# Altium PCB Temperature-Controlled DC Fan PCB.PcbDoc
Units mm, origin at the board's own origin, x right, y up, seen from the top; angles counter-clockwise.
Board outline 48.39 x 39.75 mm, 2 copper layers (Top Layer, Bottom Layer), stack 1.67 mm thick; 48 components, 58 nets, 169 pads, 21 vias.
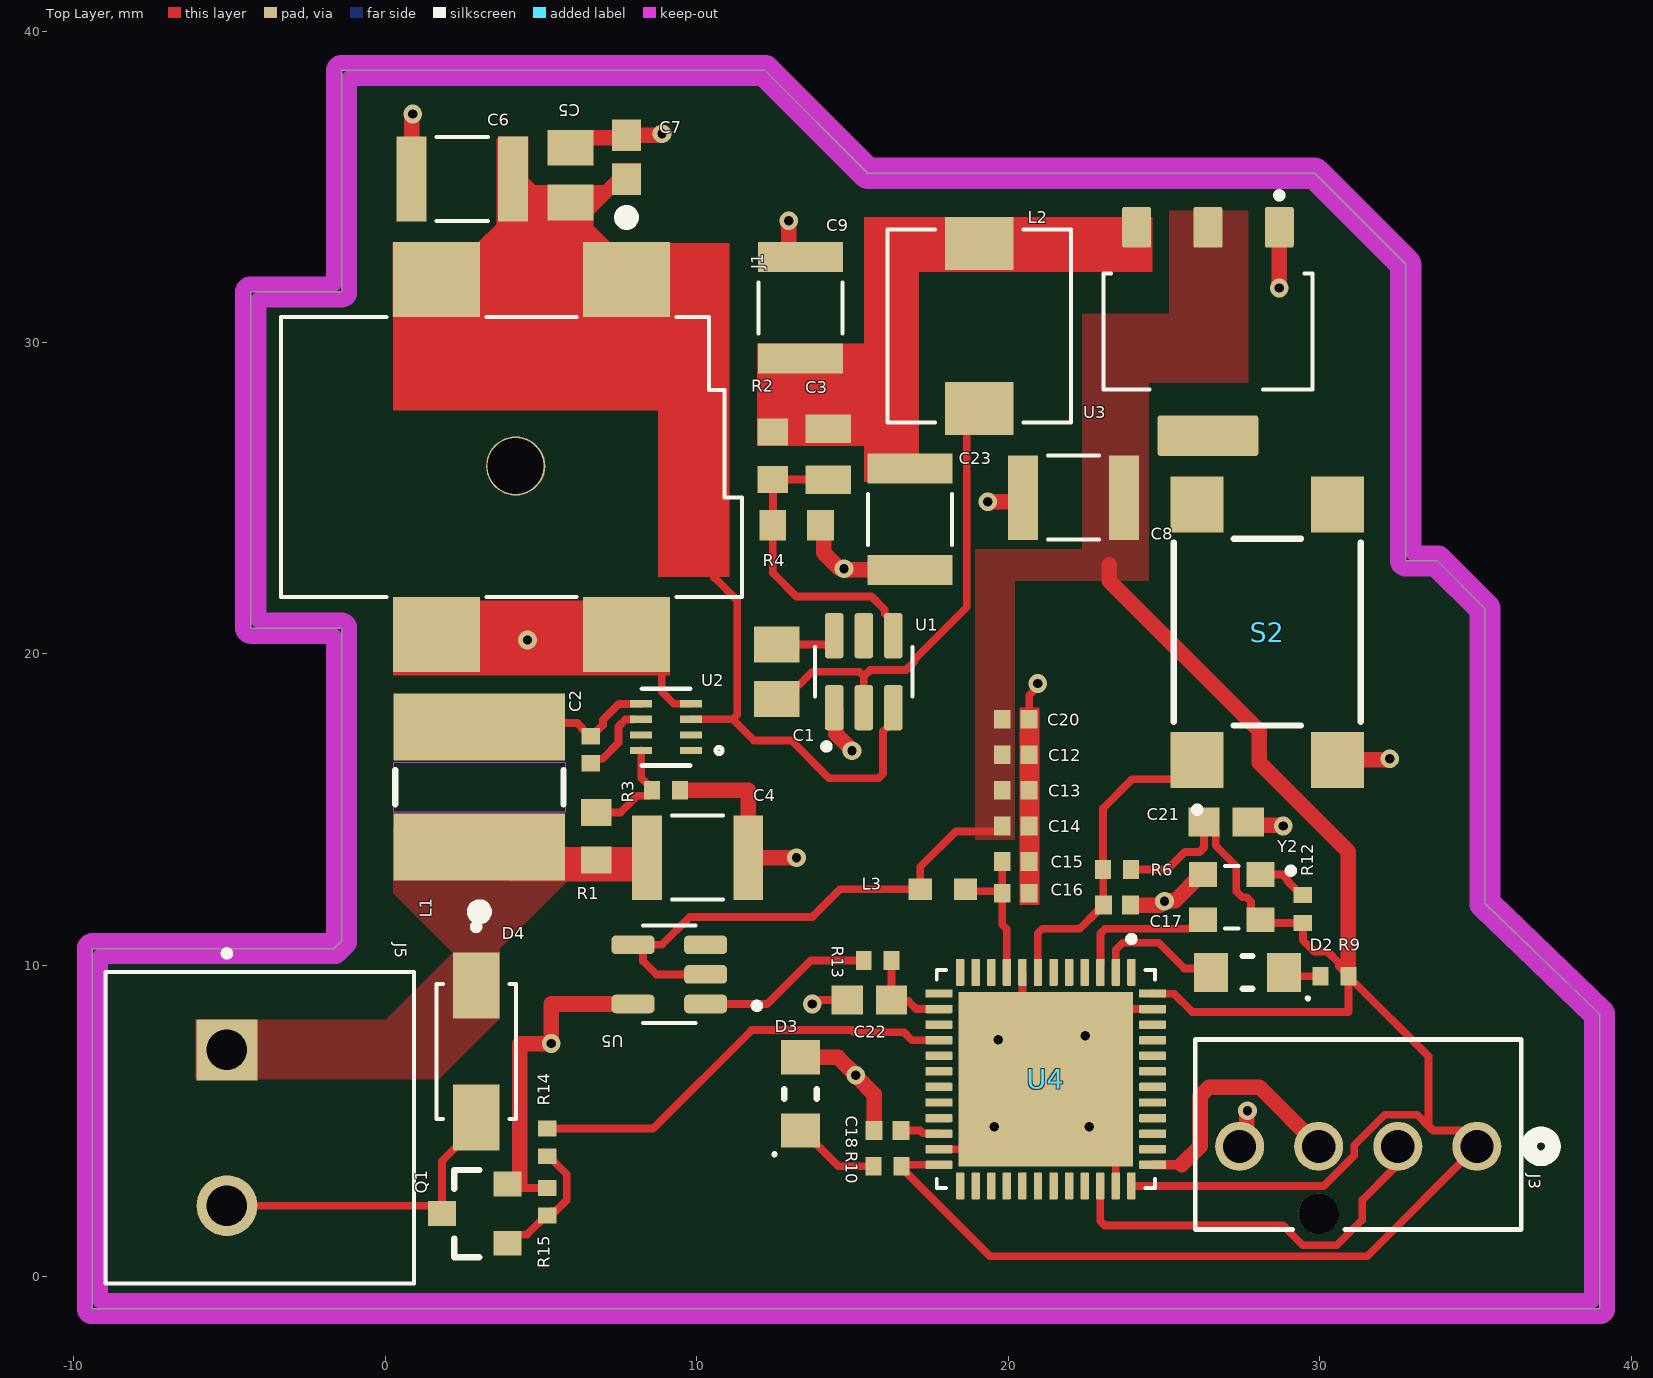
[diagram p0: Top Layer view]
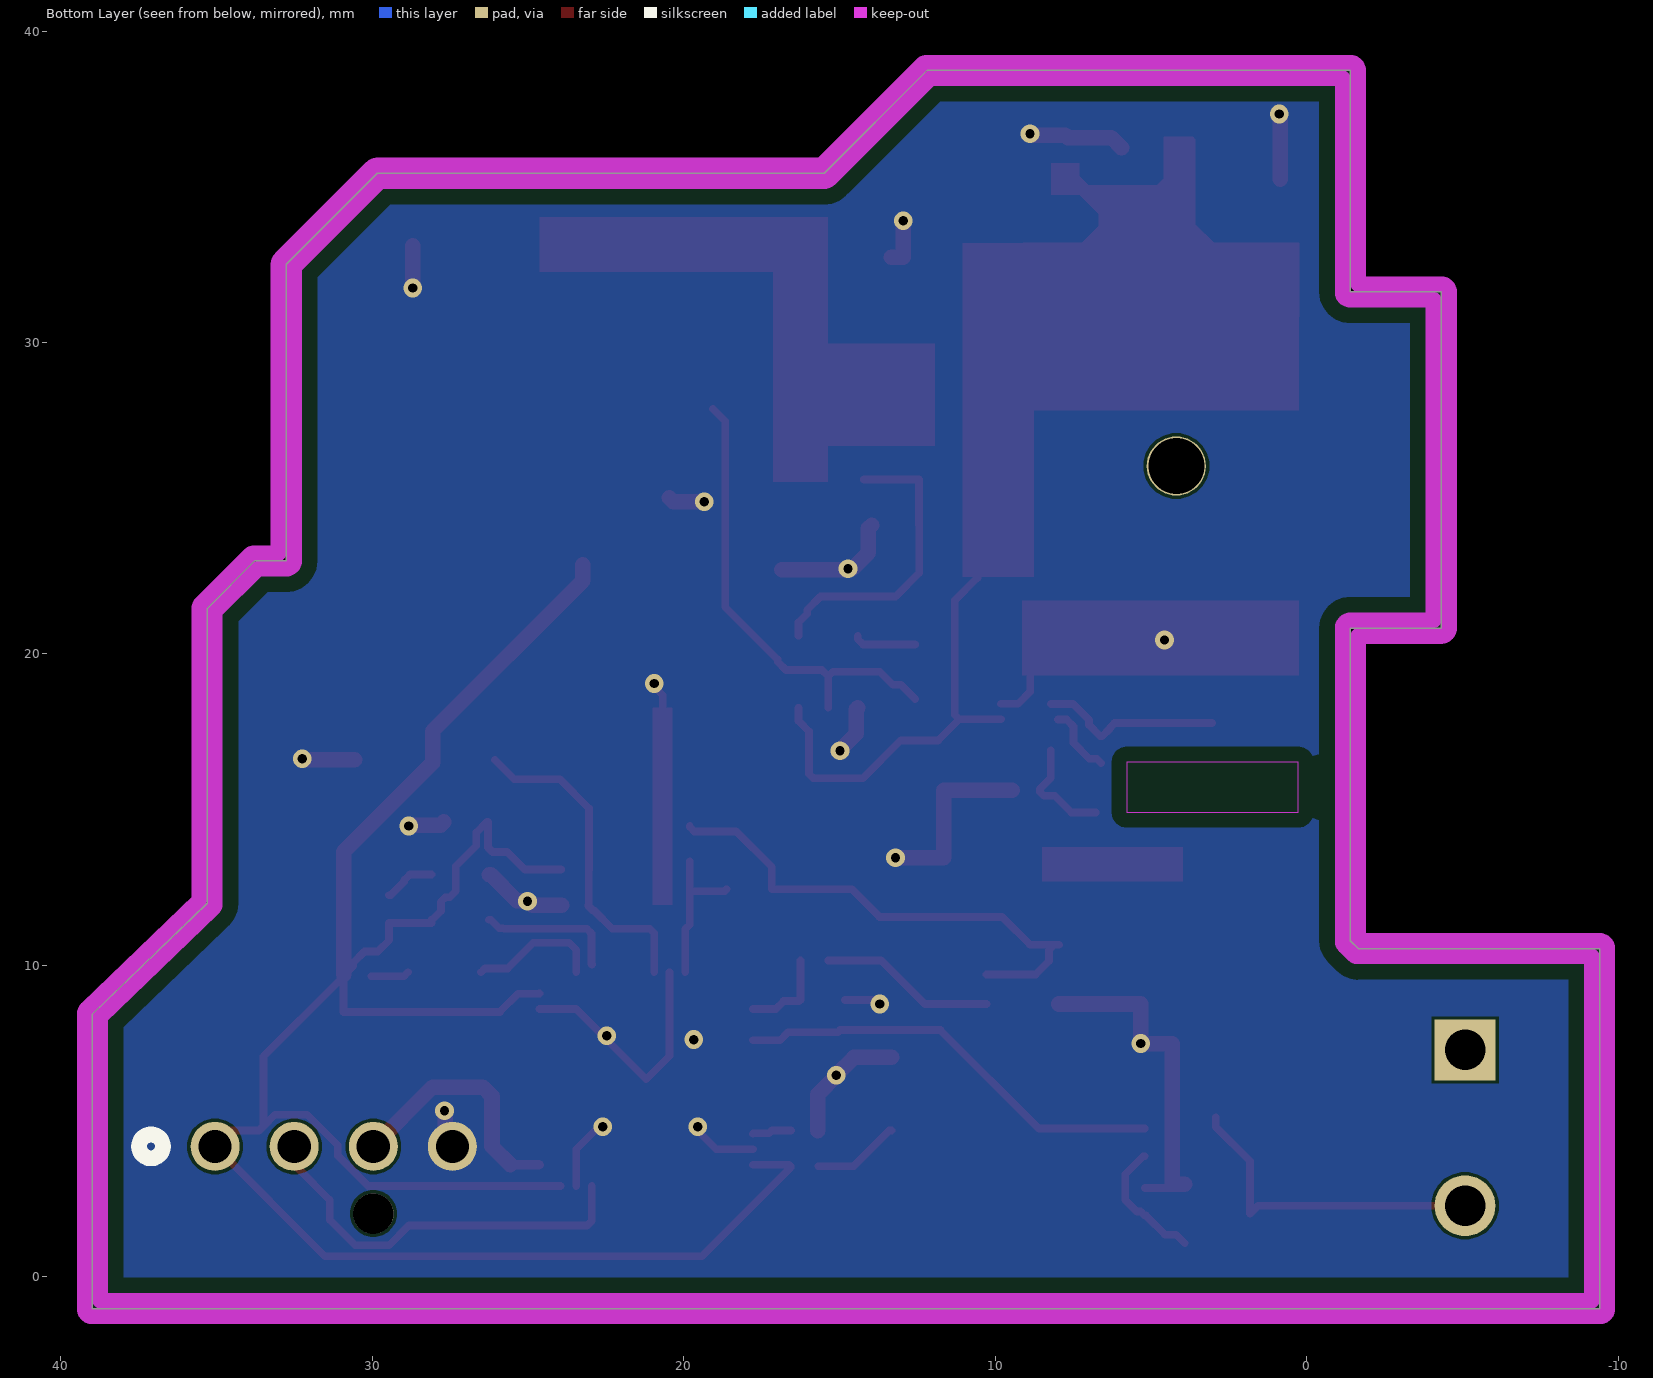
[diagram p1: Bottom Layer view, seen from below]
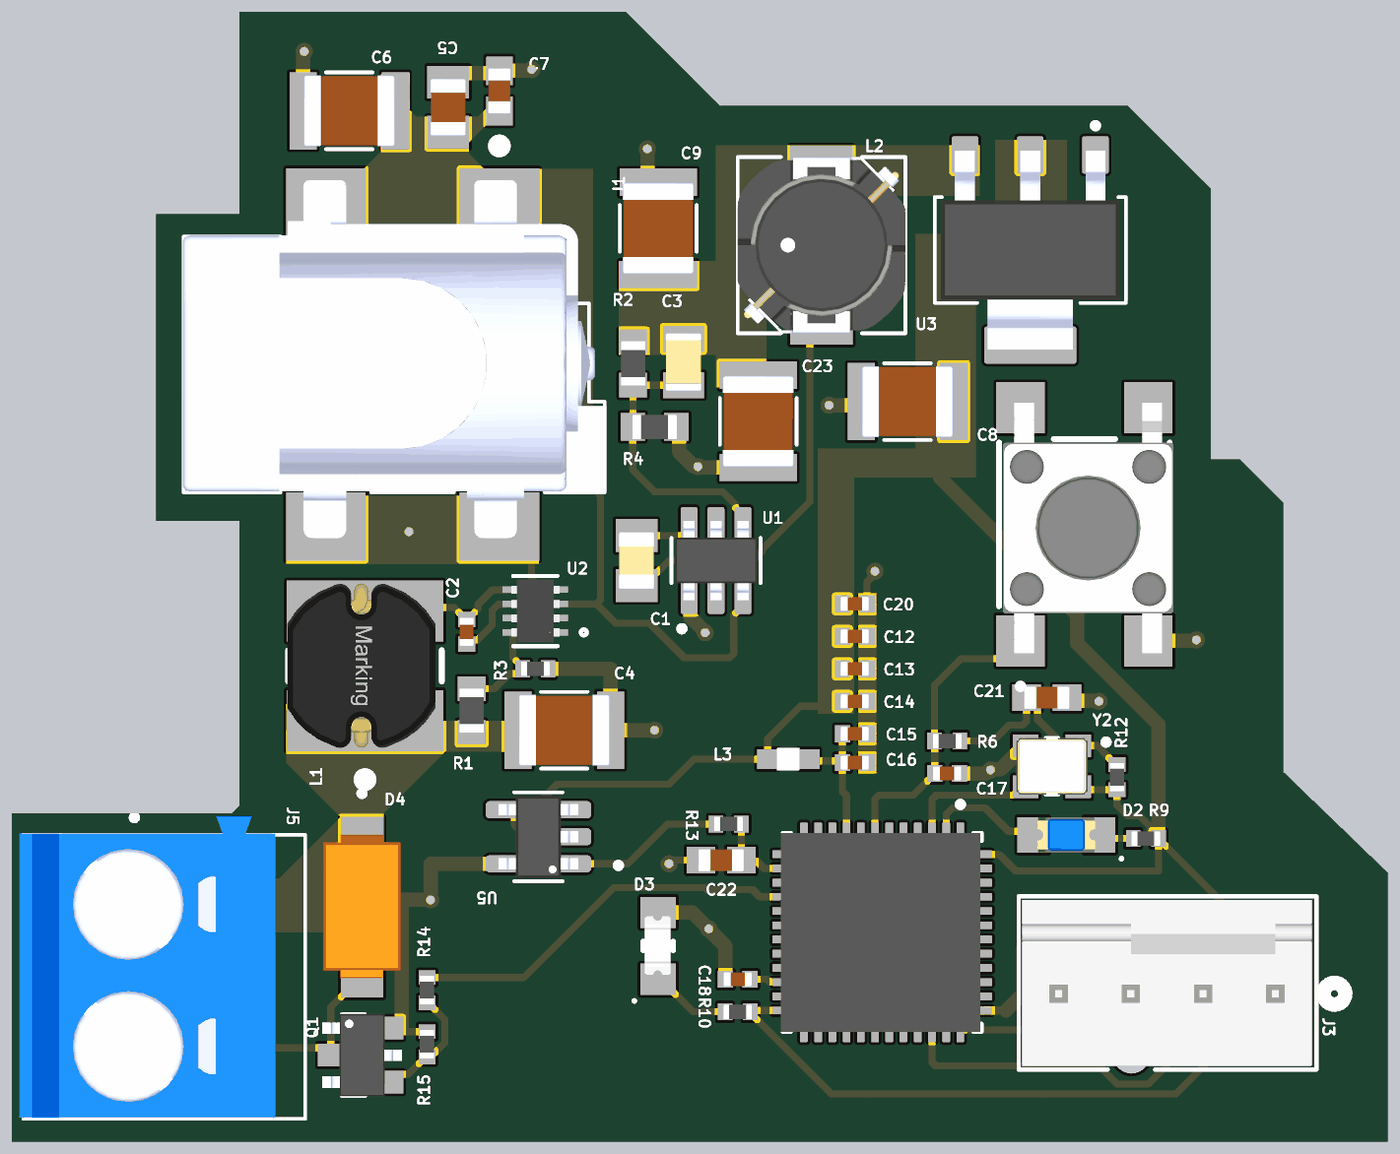
[diagram p2: 3D render of the assembled board from above, using the file's embedded part models]

## Layer stack, top to bottom
Top Solder: solder mask 0.01, Solder Resist, Dk 3.5
Top Layer: signal copper 0.035
Dielectric: dielectric 1.6, FR-4, Dk 4.5
Bottom Layer: signal copper 0.035
Bottom Solder: solder mask 0.01, Solder Resist, Dk 3.5

## Board outline
35.306,21.463 35.306,11.995 38.989,8.439 38.989,-1.016 -9.398,-1.016 -9.398,10.541 -1.651,10.541 -1.397,10.795 -1.397,20.828 -4.318,20.828 -4.318,31.623 -1.397,31.623 -1.397,38.735 12.192,38.735 15.494,35.433 29.845,35.433 32.766,32.512 32.766,22.987 33.782,22.987

## Design rules (kind name [scope] priority, off if disabled: settings)
Clearance Keepout [IsKeepOut] p1: gap=0.5 ignorepadtopadclearanceinfootprint=FALSE
Clearance [All] p2: gap=0.1 ignorepadtopadclearanceinfootprint=FALSE
HoleSize [All] p1: absolutevalues=TRUE maxlimit=6.3 minlimit=0.2 maxpercent=80.000 minpercent=20.000
HoleToHoleClearance [All] p1: gap=0.45 allowstackedmicrovias=TRUE
MinimumSolderMaskSliver [All] p1: minsoldermaskwidth=0
PlaneClearance [All] p1: clearance=0.2
PlaneConnect [All] p1: planeconnectstyle=Direct reliefexpansion=0.508 reliefentries=4 reliefconductorwidth=0.254 reliefairgap=0.254
PolygonConnect [All] p1: connectstyle=Direct reliefconductorwidth=0.254 reliefentries=4 polygonreliefangle="90 Angle" airgapwidth=0.254
RoutingTopology [All] p1: topology=Starburst
RoutingVias [All] p1: holewidth=0.3 width=0.6 viastyle="Through Hole" minholewidth=0.3 minwidth=0.6 maxholewidth=5 maxwidth=10
RoutingVias "Power Vias" [All] p2: holewidth=0.3 width=0.6 viastyle="Through Hole" minholewidth=0.3 minwidth=0.6 maxholewidth=5 maxwidth=10
SilkToSilkClearance [All] p1: silktosilkclearance=0
SilkToSolderMaskClearance [IsPad] p1: minsilkscreentomaskgap=0.1 clearancetoexposedcopper=TRUE
SolderMaskExpansion [All] p1: expansion=0.1 istentingtop=FALSE
SupplyNets "Schematic Supply Nets_4" [InNet('VCC')] p1: voltage=0.000
SupplyNets "Schematic Supply Nets_3" [InNet('+5')] p2: voltage=0.000
SupplyNets "Schematic Supply Nets_2" [InNet('+12')] p3: voltage=0.000
SupplyNets "Schematic Supply Nets_1" [InNet('GND')] p4: voltage=0.000
SupplyNets "Schematic Supply Nets" [InNet('+3.3')] p5: voltage=0.000
Width [All] p1: maxlimit=0.5 minlimit=0.2 preferedwidth=0.25 checkconnectedcopper=TRUE
Width "Power Width" [InNetClass('Power')] p2: maxlimit=2 minlimit=1 preferedwidth=1.2
22 further rules are at their usual default settings.

## Classes and differential pairs
component class U_Sensor: C21 C22 R13 U5
component class U_Actuator: D4 Q1 R14 R15
component class U_Power: C1 C2 C3 C4 C5 C6 C7 C8 C9 C23 J1 L1 L2 R1 R2 R3 R4 U1 U2 U3
component class U_MCU: C12 C13 C14 C15 C16 C17 C18 C20 D2 D3 J3 L3 R6 R9 R10 R12 S2 U4 Y2

## Components (designator, comment, footprint, x,y, rotation, side; value= is the part's Value field where it differs from the comment)
C1 "100 nF" CAPC2012X88N 12.573,19.431 r270 top
C2 "100nF" CAPC1005X55N 6.6,16.925 r270 top
C3 "68 pF" CAPC2013X88N 14.225,26.413 r90 top
C4 "47uF" CAPC3225X270N 10.033,13.462 r0 top
C5 "6.8 µF" CAPC2012X145N 5.95,35.375 r270 top
C6 "10uF" CAPC3225X270N 2.475,35.25 r0 top
C7 "100nF" CAPC1608X90N 7.75,35.95 r90 top
C8 "10uF" CAPC3225X270N 22.098,25.019 r0 top
C9 "10uF" CAPC3225X270N 13.335,31.115 r270 top
C12 "0.1uF" CAPC1005X55N 20.244,16.764 r180 top
C13 "0.1uF" CAPC1005X55N 20.244,15.621 r180 top
C14 "0.1uF" CAPC1005X55N 20.244,14.478 r180 top
C15 "0.1uF" CAPC1005X55N 20.244,13.335 r180 top
C16 "0.1uF" CAPC1005X55N 20.244,12.319 r180 top
C17 "0.1uF" CAPC1005X55N 23.495,11.938 r0 top
C18 "1uF" CAPC1005X55N 16.129,4.699 r180 top
C20 "8pF" CAPC1005X55N 20.244,17.907 r180 top
C21 "0.1uF" CAPC1608X90N 26.998,14.605 r180 top
C22 "100nF" CAPC1608X90N 15.547,8.89 r0 top
C23 "47 µF" CAPC3225X270N 16.85,24.325 r270 top
D2 "Kingbright Blue LED, 60 mcd 120 ° 0805" LED1913X12NBLUE 27.686,9.779 r180 top
D3 "Kingbright Red LED, 100 mcd 120 ° 0805" LED1913X12NRED 13.335,5.874 r90 top
D4 "SS14" DIOM4325X250N 2.921,7.239 r270 top
J1 "PJ-002BH-SMT-TR" CUI_PJ-002BH-SMT-TR 7.75,32.025 r0 top
J3 "470531000" CONN_SD-47053-001_H10P00_MOL 35.052,4.191 r0 top
J5 "OSTTA020161" ONSHORE_OSTTA020161 -5.08,4.786 r270 top
L1 "12uH" WE-PD2_5848 3.025,15.725 r90 top
L2 "15uH" IND_CLF6045T-150M-D 19.075,30.525 r90 top
L3 "150 Ohms100 MHz" WE-CBF_0603_W2.2 17.907,12.446 r180 top
Q1 "AO3400A" SOT23-3 2.921,2.032 r0 top
R1 "140kOhm" RESC1508X50N 6.775,14.15 r270 top
R2 "100k" RESC1508X50N 12.45,26.365 r90 top
R3 "10kOhm" RESC1005X40N 9.017,15.621 r180 top
R4 "13.7k" RESC1508X50N 13.208,24.13 r180 top
R6 "10k Ohm" RESC1005X40N 23.495,13.081 r0 top
R9 "1.5k Ohm" RESC1005X40N 30.48,9.652 r0 top
R10 "5.1k Ohm" RESC1005X40N 16.129,3.556 r0 top
R12 "10k Ohm" RESC1005X40N 29.464,11.811 r270 top
R13 "1k" RESC1005X40N 15.812,10.16 r0 top
R14 "150" RESC1005X40N 5.207,4.318 r270 top
R15 "10k" RESC1005X40N 5.207,2.413 r90 top
S2 "SWT0310-043025GSA_REVA" SW_SWT0310-043025GSA_REVA 28.321,20.701 r90 top
U1 "TPS54202DDCR" SOT95P280X110-6N 15.367,19.431 r90 top
U2 "TPS563300DRLR" SOT5X3-8_DRL_TEX 9.017,17.653 r180 top
U3 "AMS1117-3.3" SOT229P700X180-4N 26.416,30.353 r180 top
U4 "STM32F411CEU6" QFN50P700X700X60-49N 21.209,6.35 r270 top
U5 "TMP36GRTZ-REEL7" SOT95P280X145-5N 9.122,9.713 r180 top
Y2 "ECS-327ATQMV-CN-TR" OSC_ECS-2520S25-250-FN-TR 27.178,12.192 r180 top

## Footprints (in the part's own frame and the unit in brackets; to place one, negate y for a bottom-side part, rotate by r counter-clockwise, add the part's x,y. Pads: shape width x height; smd on the part's side, far side on the other; paste and mask are expansions set on the pad)
CAPC1005X55N [mm]
  rect 0.54x0.6 smd: 1(-0.432,0) 2(0.432,0)
  body extent -0.5,-0.25 0.5,0.25, height 0.55
CAPC1608X90N [mm]
  rect 1.01x0.93 smd: 1(-0.709,0) 2(0.709,0)
  body extent -0.8,-0.4 0.8,0.4, height 0.9
CAPC2012X88N [mm]
  rect 1.16x1.47 smd paste+0 mask+0.102: 1(-0.875,0) 2(0.875,0)
  body extent -1,-0.63 1,0.63, height 0.88
CAPC2012X145N [mm]
  rect 1.15x1.47 smd: 1(-0.88,0) 2(0.88,0)
  body extent -1,-0.63 1,0.63, height 1.45
CAPC2013X88N [mil]
  rect 36x57 smd: 1(-32,0) 2(32,0)
  body extent -40,-25 40,25, height 55
CAPC3225X270N [mm]
  rect 0.96x2.72 smd: 1(-1.625,0) 2(1.625,0)
  silkscreen extent -0.82,-1.35 0.82,1.35, body extent -1.6,-1.25 1.6,1.25, height 2.7
CONN_SD-47053-001_H10P00_MOL [mil]
  round 62 hole 42: 1(0,0) 2(-100,0) 3(-200,0) 4(-300,0)
  round 51 hole 51 unplated: ""(-200,-85)
  silkscreen extent -356,-105 96,135, body extent -352,-100 50,130, height 391
CUI_PJ-002BH-SMT-TR [mm]
  rect 2.8x2.4 smd: 1A(0,0) 1B(-6.1,0) 2(-6.1,-11.4) 3(0,-11.4)
  round 1.9 hole 1.8 unplated: ""(-3.559,-5.99)
  silkscreen extent -11.1,-10.2 3.7,2.19, body extent -11.13,-11.81 3.77,0.79, height 11.05
DIOM4325X250N [mm]
  rect 2.12x1.5 smd paste+0 mask+0.102: A(2.115,0) C(-2.115,0)
  silkscreen extent -4.1,-1.28 2.16,1.28, body extent -2.55,-1.35 2.5,1.35, height 2.19
IND_CLF6045T-150M-D [mm]
  rect 1.7x2.2 smd: 1(-2.65,0) 2(2.65,0)
  silkscreen extent -3.1,-2.95 3.1,2.95, body extent -3.1,-2.95 3.1,2.95, height 4.8
LED1913X12NBLUE [mm] "LED 2-Leads, Body 1.90x1.32mm, IPC Medium Density"
  rect 1.1x1.25 smd: 1(-1.175,0) 2(1.175,0)
  silkscreen extent -1.99,-0.53 0.15,0.89, body extent -1,-0.62 1.02,0.62, height 1.1
LED1913X12NRED [mm] "LED 2-Leads, Body 1.90x1.32mm, IPC Medium Density"
  rect 1.1x1.25 smd: 1(-1.175,0) 2(1.175,0)
  silkscreen extent -1.99,-0.53 0.15,0.89, body extent -1.02,-0.43 1.04,0.47, height 0.85
ONSHORE_OSTTA020161 [mm]
  rect 1.95x1.95 / inner round 1.95 / far side rect 1.95x1.95 hole 1.3: 1(-2.5,0)
  round 1.95 hole 1.3: 2(2.5,0)
  silkscreen extent -5.7,-3.9 5,6, body extent -5.65,-4.05 4.95,4.95, height 12.6
OSC_ECS-2520S25-250-FN-TR [mm]
  rect 0.9x0.8 smd: 1(-0.925,-0.725) 2(0.925,-0.725) 3(0.925,0.725) 4(-0.925,0.725)
  silkscreen extent -2,-1 0.22,1, body extent -1.25,-1 1.25,1, height 0.9
QFN50P700X700X60-49N [mm]
  rrect25% 0.87x0.27 smd: 1(-3.43,2.75) 2(-3.43,2.25) 3(-3.43,1.75) 4(-3.43,1.25) 5(-3.43,0.75) 6(-3.43,0.25) 7(-3.43,-0.25) 8(-3.43,-0.75) 9(-3.43,-1.25) 10(-3.43,-1.75) 11(-3.43,-2.25) 12(-3.43,-2.75) 25(3.43,-2.75) 26(3.43,-2.25) 27(3.43,-1.75) 28(3.43,-1.25) 29(3.43,-0.75) 30(3.43,-0.25) 31(3.43,0.25) 32(3.43,0.75) 33(3.43,1.25) 34(3.43,1.75) 35(3.43,2.25) 36(3.43,2.75)
  rrect25% 0.27x0.87 smd: 13(-2.75,-3.43) 14(-2.25,-3.43) 15(-1.75,-3.43) 16(-1.25,-3.43) 17(-0.75,-3.43) 18(-0.25,-3.43) 19(0.25,-3.43) 20(0.75,-3.43) 21(1.25,-3.43) 22(1.75,-3.43) 23(2.25,-3.43) 24(2.75,-3.43) 37(2.75,3.43) 38(2.25,3.43) 39(1.75,3.43) 40(1.25,3.43) 41(0.75,3.43) 42(0.25,3.43) 43(-0.25,3.43) 44(-0.75,3.43) 45(-1.25,3.43) 46(-1.75,3.43) 47(-2.25,3.43) 48(-2.75,3.43)
  rect 5.6x5.6 smd paste-4: 49(0,0)
  silkscreen extent -4.6,-3.5 3.5,3.5, body extent -3.5,-3.56 3.5,3.44, height 0.6
RESC1005X40N [mm]
  rect 0.51x0.6 smd paste+0 mask+0.102: 1(-0.445,0) 2(0.445,0)
  body extent -0.5,-0.25 0.5,0.25, height 0.4
RESC1508X50N [mm]
  rect 0.86x0.98 smd paste+0 mask+0.102: 1(-0.765,0) 2(0.765,0)
  body extent -0.77,-0.43 0.77,0.43, height 0.5
SOT5X3-8_DRL_TEX [mm]
  rect 0.706x0.229 smd paste+0 mask+0: 1(-0.798,0.75) 2(-0.798,0.25) 3(-0.798,-0.25) 4(-0.798,-0.75) 5(0.798,-0.75) 6(0.798,-0.25) 7(0.798,0.25) 8(0.798,0.75)
  silkscreen extent -1.8,-1.23 0.77,1.23, body extent -0.85,-1.1 0.85,1.1, height 0.61
SOT23-3 [mm]
  rect 0.9x0.8 smd: 1(1,-0.95) 2(1,0.95) 3(-1.1,0)
  silkscreen extent -0.7,-1.4 0.1,1.4, body extent -1.4,-1.45 1.4,1.45, height 1.25
SOT95P280X110-6N [mm]
  rrect25% 1.45x0.59 smd: 1(-1.155,0.95) 2(-1.155,0) 3(-1.155,-0.95) 4(1.155,-0.95) 5(1.155,0) 6(1.155,0.95)
  silkscreen extent -2.5,-1.56 0.8,1.56, body extent -1.4,-1.45 1.4,1.45, height 1.1
SOT95P280X145-5N [mm]
  rrect50% 1.39x0.6 smd: 1(-1.165,0.95) 2(-1.165,0) 3(-1.165,-0.95) 4(1.165,-0.95) 5(1.165,0.95)
  silkscreen extent -2.91,-1.56 0.85,1.56, body extent -1.4,-1.45 1.4,1.45, height 1.45
SOT229P700X180-4N [mm]
  rrect15% 0.93x1.31 smd: 1(-2.29,-3.345) 2(0,-3.345) 3(2.29,-3.345)
  rrect15% 3.24x1.31 smd: 4(0,3.345)
  silkscreen extent -3.36,-4.47 3.36,1.86, body extent -3.15,-3.5 3.15,3.5, height 1.8
SW_SWT0310-043025GSA_REVA [mm]
  rect 1.8x1.7 smd paste+0 mask+0.102: 1(-4.1,2.25) 2(4.1,2.25) 3(-4.1,-2.25) 4(4.1,-2.25)
  silkscreen extent -5.8,-3 3,3, body extent -4.53,-3.13 4.27,2.87, height 4.3
WE-CBF_0603_W2.2 [mm]
  rect 0.75x0.7 smd: 1(-0.725,0) 2(0.725,0)
  body extent -0.4,-0.4 0.4,0.4, height 0.8
WE-PD2_5848 [mm]
  rect 2.15x5.5 smd paste+0 mask+0.102: 1(-1.925,0) 2(1.925,0)
  Keep-Out Layer region: 0.8,-2.75 -0.8,-2.75 -0.8,2.75 0.8,2.75
  silkscreen extent -4.2,-2.7 0.55,2.7, body extent -2.89,-2.47 2.9,2.73, height 4.5

## Part data
C1: library part C0805C104M5RACTU, "0.1 ÂµF Â±20% 50V Ceramic Capacitor X7R 0805 (2012 Metric)", Package=Package, Check_prices=https://www.snapeda.com/parts/C0805C104M5RAC-TU/Kemet/view-part/?ref=eda, MF=Kemet, MP=C0805C104M5RAC-TU, SnapEDA_Link=https://www.snapeda.com/parts/C0805C104M5RAC-TU/Kemet/view-part/?ref=snap
C2 C12 C13 C14 C15 C16 C17 C18 C20: library part GRM155R71A104KA01D, "GRM155R71A104KA01D Cap C eramic 0.1uF 10VDC X7R 10 % SMD 0402 Paper T/R RoHS", Package="1005-2 Murata", Check_prices=https://www.snapeda.com/parts/GRM155R71A104KA01D/Murata/view-part/?ref=eda, MF=Murata, MP=GRM155R71A104KA01D, SnapEDA_Link=https://www.snapeda.com/parts/GRM155R71A104KA01D/Murata/view-part/?ref=snap
C3: library part C0805C680J5GACTU, "Capacitor;Ceramic;Cap;68.0pF;Tol+5%;SMT;Vol-Rtg 50V;C0G", Package="0805 Kemet", Check_prices=https://www.snapeda.com/parts/C0805C680J5GACTU/KEMET/view-part/?ref=eda, MF=KEMET, MP=C0805C680J5GACTU, SnapEDA_Link=https://www.snapeda.com/parts/C0805C680J5GACTU/KEMET/view-part/?ref=snap
C4 C23: library part GRM32ER61C476KE15L, "SMD Capacitor X5R(EIA) with Capacitance: 47uF Tol. 10%. Rated Voltage: 16Vdc", Package="3225 Murata", Check_prices=https://www.snapeda.com/parts/GRM32ER61C476KE15L/Murata+Electronics+North+America/view-part/?ref=eda, MF="Murata Electronics", MP=GRM32ER61C476KE15L, SnapEDA_Link=https://www.snapeda.com/parts/GRM32ER61C476KE15L/Murata+Electronics+North+America/view-part/?ref=snap
C5: library part C2012X5R1V685K125AC, "6.8Î¼F Â±10% 35V é™¶ç“·ç”µå®¹å™¨ X5R 0805ï¼ˆ2012 å…¬åˆ¶ï¼‰", Package="2012 TDK", Availability="In Stock", Check_prices=https://www.snapeda.com/parts/C2012X5R1V685K125AC/TDK-Lambda+Americas+Inc/view-part/?ref=eda, MF=TDK, MP=C2012X5R1V685K125AC, Price=None, Purchase-URL=https://pricing.snapeda.com/search/part/C2012X5R1V685K125AC/?ref=eda, SnapEDA_Link=https://www.snapeda.com/parts/C2012X5R1V685K125AC/TDK-Lambda+Americas+Inc/view-part/?ref=snap
C6: library part MSASU32MSB5106KPNA01, "10uF 50V 10% Multilayer Ceramic Capacitor X5R 1210 (3225 Metric)", Package="3225-2 TAIYO", Check_prices=https://www.snapeda.com/parts/MSASU32MSB5106KPNA01/Taiyo+Yuden/view-part/?ref=eda, MF="Taiyo Yuden", MP=MSASU32MSB5106KPNA01, SnapEDA_Link=https://www.snapeda.com/parts/MSASU32MSB5106KPNA01/Taiyo+Yuden/view-part/?ref=snap
C7 C21 C22: library part CGA3E2X7R1H104K080AA, "0.1ÂµF Â±10% 50V Ceramic Capacitor X7R 0603 (1608 Metric)", Package="1608 TDK", Check_prices=https://www.snapeda.com/parts/CGA3E2X7R1H104K080AA/TDK-Lambda+Americas+Inc/view-part/?ref=eda, MF=TDK, MP=CGA3E2X7R1H104K080AA, Purchase-URL=https://pricing.snapeda.com/search/part/CGA3E2X7R1H104K080AA/?ref=eda, SnapEDA_Link=https://www.snapeda.com/parts/CGA3E2X7R1H104K080AA/TDK-Lambda+Americas+Inc/view-part/?ref=snap
C8 C9: library part MSASU32MSB5106KPNA01, "Cap = 10 µF / Total Derated Cap = 3.5 µF / VDC = 25 V / ESR = 5.85 mΩ / Package = 0805", Package="3225-2 TAIYO", Check_prices=https://www.snapeda.com/parts/MSASU32MSB5106KPNA01/Taiyo+Yuden/view-part/?ref=eda, MF="Taiyo Yuden", MP=MSASU32MSB5106KPNA01, SnapEDA_Link=https://www.snapeda.com/parts/MSASU32MSB5106KPNA01/Taiyo+Yuden/view-part/?ref=snap
D2: Color=Blue, Forward Voltage=3.2V, Manufacturer=KingBright, Manufacturer Part No.=KP-2012PBC-A, Creator="Ritesh Kanjee", Datasheet URL=http://za.rs-online.com/web/p/visible-leds/4663784/, Date Created="18 February 2015", RS Stock No.=466-3784
D3: Color=RED, Forward Voltage=1.85V, Manufacturer=KingBright, Manufacturer Part No.=KP-2012SRC-PRV, Creator="Ritesh Kanjee", Datasheet URL=http://za.rs-online.com/web/p/visible-leds/4663813/, Date Created="18 February 2015", RS Stock No.=466-3813
D4: "1A, 40V, Schottky Rectifier", Package="SMA-2 Taiwan Semiconductor", Check_prices=https://www.snapeda.com/parts/SS14/taiwan/view-part/?ref=eda, MF="Taiwan Semiconductor", MP=SS14, SnapEDA_Link=https://www.snapeda.com/parts/SS14/taiwan/view-part/?ref=snap
J1: "2.5 x 6.5 mm, 5.0 A, Horizontal, Surface Mount (SMT), Dc Power Jack Connector", Package=None, Check_prices=https://www.snapeda.com/parts/PJ-002BH-SMT-TR/Same+Sky/view-part/?ref=eda, MF="Same Sky", MP=PJ-002BH-SMT-TR, SnapEDA_Link=https://www.snapeda.com/parts/PJ-002BH-SMT-TR/Same+Sky/view-part/?ref=snap
J3: "Conn Wire to Board HDR 4 POS 2.54mm Solder ST Thru-Hole KKÂ® Bag", Package=None, Check_prices=https://www.snapeda.com/parts/470531000/Molex/view-part/?ref=eda, MF=Molex, MP=470531000, SnapEDA_Link=https://www.snapeda.com/parts/470531000/Molex/view-part/?ref=snap
J5: Package=None, Availability=Unavailable, MP=OSTTA020161, Price=None
L1: library part WE-PD2_5848, "FIXED IND 12UH 2A 110 MOHM SMD", Package="Nonstandard WÃ¼rth Elektronik", Check_prices=https://www.snapeda.com/parts/744774112/W%25C3%25BCrth+Elektronik+Midcom/view-part/?ref=eda, MF="WÃ¼rth Elektronik", MP=744774112, SnapEDA_Link=https://www.snapeda.com/parts/744774112/W%25C3%25BCrth+Elektronik+Midcom/view-part/?ref=snap
L2: library part CLF6045T-150M-D, "Ind Power Shielded Wirewound 15uH 20% 100KHz Ferrite 2A Blister Plastic T/R", Package="NON STANDARD-2 TDK", Availability="In Stock", Check_prices=https://www.snapeda.com/parts/CLF6045T-150M-D/TDK/view-part/?ref=eda, MF=TDK, MP=CLF6045T-150M-D, Price=None, Purchase-URL=https://pricing.snapeda.com/search/part/CLF6045T-150M-D/?ref=eda, SnapEDA_Link=https://www.snapeda.com/parts/CLF6045T-150M-D/TDK/view-part/?ref=snap
L3: library part WE-CBF_0603, "150 Ohms @ 100 MHz 1 Power, Signal Line Ferrite Bead 0402 (1005 Metric) 100mA 300mOhm", Package="0603 Wurth Elektronik", Check_prices=https://www.snapeda.com/parts/742792693/W%25C3%25BCrth+Elektronik+Midcom/view-part/?ref=eda, MF="WÃ¼rth Elektronik", MP=742792693, SnapEDA_Link=https://www.snapeda.com/parts/742792693/W%25C3%25BCrth+Elektronik+Midcom/view-part/?ref=snap
Q1: "N-Channel 30 V 5.8A (Ta) 1.4W (Ta) Surface Mount SOT-23", Package=None, Check_prices=https://www.snapeda.com/parts/AO3400A/UMW/view-part/?ref=eda, MF=UMW, MP=AO3400A, SnapEDA_Link=https://www.snapeda.com/parts/AO3400A/UMW/view-part/?ref=snap
R1 R2 R4: library part CRCW0603140KFKEA, "140 kOhms Â±1% 0.1W, 1/10W Chip Resistor 0603 (1608 Metric) Automotive AEC-Q200 Thick Film", Package=Package, Check_prices=https://www.snapeda.com/parts/CRCW0603140KFKEA/Dale/view-part/?ref=eda, MF="Vishay Dale", MP=CRCW0603140KFKEA, SnapEDA_Link=https://www.snapeda.com/parts/CRCW0603140KFKEA/Dale/view-part/?ref=snap
R3 R6 R9 R10 R12 R13 R14 R15: library part CRCW040210K0FKED, "Resistor;Thick Film;10 Kilohms;0.063 W;1%;SMT;0402;TCR 37 ppm/DegC;Tape and Reel", Package=Package, Check_prices=https://www.snapeda.com/parts/CRCW040210K0FKED/Dale/view-part/?ref=eda, MF="Vishay Dale", MP=CRCW040210K0FKED, SnapEDA_Link=https://www.snapeda.com/parts/CRCW040210K0FKED/Dale/view-part/?ref=snap
S2: "6mm x 6mm Gull Wing Tactile Switch", Package=None, Check_prices=https://www.snapeda.com/parts/SWT0310-043025GSA/Global+Connector+Technology/view-part/?ref=eda, MF="Global Connector Technology", MP=SWT0310-043025GSA, SnapEDA_Link=https://www.snapeda.com/parts/SWT0310-043025GSA/Global+Connector+Technology/view-part/?ref=snap
U1: "4.5V to 28V Input, 2A Output, EMI Friendly Synchronous Step-Down Converter", Package="SOT-23-THN-6 Texas Instruments", Check_prices=https://www.snapeda.com/parts/TPS54202DDCR/Texas+Instruments/view-part/?ref=eda, MF="Texas Instruments", MP=TPS54202DDCR, SnapEDA_Link=https://www.snapeda.com/parts/TPS54202DDCR/Texas+Instruments/view-part/?ref=snap
U2: "3.8-V to 28-V Input, 3-A synchronous buck converter in SOT-583 package 8-SOT-5X3 -40 to 150", Manufacturer_Name="Texas Instruments", Copyright="Copyright (C) 2026 Ultra Librarian. All rights reserved.", Manufacturer_Part_Number=TPS563300DRLR, Refdes=RefDes, Type=Type
U3: "Linear Voltage Regulator IC Positive Fixed 1 Output 1A SOT-223-3L", Package="SOT-223-3L UMW", Check_prices=https://www.snapeda.com/parts/AMS1117-3.3/UMW/view-part/?ref=eda, MF=UMW, MP=AMS1117-3.3, SnapEDA_Link=https://www.snapeda.com/parts/AMS1117-3.3/UMW/view-part/?ref=snap
U4: "High-performance access line, ARM Cortex-M4 core with DSP and FPU, 512 Kbytes Flash, 100 MHz CPU, ART Accelerator", Package=None, Availability=Unavailable, MP=STM32F411CEU6, Price=None
U5: "Voltage Output Temperature Sensors", Package="SOT-5 Analog Devices", Check_prices=https://www.snapeda.com/parts/TMP36GRTZ-REEL7/Analog+Devices/view-part/?ref=eda, MF="Analog Devices", MP=TMP36GRTZ-REEL7, SnapEDA_Link=https://www.snapeda.com/parts/TMP36GRTZ-REEL7/Analog+Devices/view-part/?ref=snap
Y2: library part ECS-2520MV-250-CN-TR, "32.768 kHz XO (Standard) CMOS Oscillator 1.62V ~ 3.63V Enable/Disable 4-SMD, No Lead", Package="ECS-2520MV-0-4 ECS", Check_prices=https://www.snapeda.com/parts/ECS-2520MV-250-CN-TR/ECS/view-part/?ref=eda, MF="ECS Inc.", MP=ECS-2520MV-250-CN-TR, SnapEDA_Link=https://www.snapeda.com/parts/ECS-2520MV-250-CN-TR/ECS/view-part/?ref=snap

## Via types
v1: diameter 0.6, hole 0.3, Top Layer to Bottom Layer, tented both sides, 21 vias

## Nets (pads, with @x,y where several pads share a name; then routed paths per layer and width w, separated by ;. In a path a pad name is that pad's centre, name@x,y a point inside that pad or via, vN(x,y) a via of type N, cw(c..) or ccw(c..) an arc to the next point about the centre after c; other vN are vias at no path point)
+3.3: C8.2 C12.2 C13.2 C14.2 C20.2 C21.2 J3.1 L3.2 R6.2 R9.2 R10.2 R12.2 U3.2 U4.24 U4.36 U4.48 U5.2 U5.4 Y2.4 | length 92.7
  Top Layer w0.25: U5.4 U5.4@8.107,10.663 ; U5.2 8.702,9.713 8.281,10.134 8.281,10.49 U5.4@8.107,10.663 ; U4.24 16.618,3.6 R10.2 16.574,3.511 19.419,0.666 31.527,0.666 J3.1 ; C14.2 19.812,14.448 19.667,14.303 18.316,14.303 17.182,13.169 L3.2 14.605,12.446 13.716,11.557 9.779,11.557 8.885,10.663 U5.4@8.107,10.663 ; R6.2 25.107,13.081 25.668,13.642 26.143,13.642 26.289,13.788 C21.2 26.329,14.605 26.669,14.265 26.669,13.844 27.328,13.185 27.328,12.382 27.518,12.192 27.655,12.192 27.801,12.046 27.801,11.742 28.076,11.467 Y2.4 28.103,11.366 R12.2 29.464,10.811 29.826,10.449 30.253,10.449 30.615,10.087 30.615,9.973 30.761,9.827 30.795,9.827 30.925,9.697 R9.2 R9.2@30.925,9.607 ; U4.36 30.133,2.92 31.113,3.9 31.113,4.223 32.093,5.203 33.139,5.203 33.497,4.845 ; U4.48 24.649,9.09 25.327,9.09 25.908,8.509 30.925,8.509 R9.2@30.925,9.607 ; J3.1@34.925,4.699 33.644,4.699 33.497,4.845 ; R9.2@30.925,9.607 31.055,9.477 31.1,9.477 33.497,7.08 33.497,4.845
  Top Layer w0.5: 23.241,22.86 23.241,22.352 28.067,17.526 28.067,16.51 30.925,13.652 R9.2@30.925,9.697
+5: C3.2 C9.2 C23.1 L2.2 R2.2 U3.3
+12: C4.1 D4.C J5.1 L1.1 R1.2
BOOT0: U4.44
Drain: D4.A J5.2 Q1.3 | length 10.6
  Top Layer w0.25: J5.2 1.567,2.286 Q1.3 1.821,3.714 2.921,4.814 D4.A
FB: R1.1 R3.2 U2.8 | length 3.5
  Top Layer w0.25: R1.1 7.561,14.915 8.092,15.446 8.442,15.446 8.572,15.576 R3.2 8.572,15.666 8.219,16.019 U2.8
FB1: C3.1 R2.1 R4.2 U1.4 | length 9.8
  Top Layer w0.25: C3.1 R2.1 12.45,24.137 R4.2 12.443,22.603 13.202,21.844 15.616,21.844 16.037,21.423 16.037,21.296 16.317,21.016 U1.4
Gate: Q1.1 R14.2 R15.1 | length 4.2
  Top Layer w0.25: Q1.1 4.196,1.357 4.551,1.357 5.162,1.968 R15.1 5.337,2.098 5.462,2.098 5.832,2.468 5.832,3.293 5.252,3.873 R14.2
GND: C4.2 C5.1 C6.1 C7.2 C8.1 C9.1 C12.1 C13.1 C14.1 C15.1 C16.1 C17.2 C18.2 C20.1 C21.1 C22.1 C23.2 D3.2 J1.2 J1.3 J3.4 Q1.2 R3.1 R4.1 R15.2 S2.3 U1.1 U2.4 U3.1 U4.8 U4.23 U4.35 U4.47 U4.49 U5.5 Y2.2 | length 60.7
  Top Layer w0.25: Q1.2 4.045,2.858 R15.2 ; J1.3 8.436,19.939 8.509,19.939 8.877,19.571 8.877,18.796 9.27,18.403 U2.4 ; v1(13.716,8.763) 13.811,8.763 13.938,8.89 C22.1 ; U4.23 18.959,4.1 U4.49@19.621,4.763 ; U4.8 20.459,7.1 U4.49 23.459,8.6 U4.47 ; C20.1 20.676,18.676 20.955,18.955 v1(20.955,19.05) ; U4.49@22.669,4.889 23.459,4.1 U4.35
  Top Layer w0.5: C6.1 0.85,37.272 0.889,37.311 v1(0.889,37.338) ; Q1.2 4.318,2.982 4.318,7.493 v1(5.334,7.493) 5.334,8.763 U5.5 ; C5.1 6.275,36.58 7.671,36.58 C7.2 8.819,36.659 8.863,36.703 v1(8.89,36.703) ; R3.1 11.658,15.621 C4.2 v1(13.208,13.462) ; v1(12.954,33.909) 12.954,32.74 C9.1 ; D3.2 14.541,7.049 v1(15.113,6.477) 15.113,6.45 15.697,5.866 C18.2 ; R4.1 14.075,24.028 14.075,23.251 14.574,22.752 14.713,22.752 v1(14.732,22.733) 14.732,22.7 C23.2 ; U1.1 14.462,18.231 14.462,17.442 14.986,16.918 v1(14.986,16.891) ; v1(19.344,24.892) 20.346,24.892 C8.1 ; C17.2 24.865,11.938 24.992,12.065 v1(25.019,12.065) 25.038,12.084 25.37,12.084 26.203,12.917 Y2.2 ; J3.4@27.559,4.699 27.667,4.807 27.667,5.315 v1(27.686,5.334) ; C21.1 27.815,14.497 28.81,14.497 v1(28.829,14.478) ; v1(28.702,31.75) 28.702,33.106 U3.1@28.706,33.106 ; S2.3 32.195,16.601 32.231,16.637 v1(32.258,16.637)
  other v1: 19.558,4.826 22.606,4.826 19.685,7.62 22.479,7.747 4.572,20.447
NetC1_1: C1.1 U1.6 | length 2
  Top Layer w0.25: C1.1 14.247,20.306 14.417,20.476 U1.6
NetC1_2: C1.2 L2.1 U1.2 | length 15
  Top Layer w0.25: C1.2 13.028,19.011 13.296,19.011 13.713,19.428 15.221,19.428 15.367,19.282 ; U1.2 15.367,19.282 ; L2.1 18.669,27.469 18.669,21.502 16.987,19.82 16.987,19.749 16.724,19.486 15.571,19.486 15.367,19.282
NetC2_1: C2.1 L1.2 U2.5 | length 5.9
  Top Layer w0.25: L1.2@3.048,17.78 6.173,17.78 6.319,17.634 6.319,17.608 6.57,17.357 C2.1 6.63,17.357 6.991,17.718 6.991,17.88 7.504,18.393 8.209,18.393 U2.5
NetC2_2: C2.2 U2.6 | length 2.3
  Top Layer w0.25: C2.2 6.745,16.638 6.981,16.638 7.491,17.148 7.491,17.673 7.711,17.893 U2.6@7.991,17.893
NetC18_1: C18.1 U4.22 | length 1.3
  Top Layer w0.25: C18.1 17.17,4.699 17.259,4.61 17.769,4.61 U4.22
NetD2_1: D2.1 R9.1 | length 1.2
  Top Layer w0.25: D2.1 28.988,9.652 R9.1
NetD3_1: D3.1 R10.1 | length 2.8
  Top Layer w0.25: D3.1 13.41,4.699 14.553,3.556 R10.1
NetR12_1: R12.1 Y2.1 | length 1.7
  Top Layer w0.25: Y2.1 28.803,12.917 28.98,12.74 28.98,12.695 29.419,12.256 R12.1
NRST: C17.1 R6.1 S2.1 U4.7 | length 10.5
  Top Layer w0.25: U4.7@20.955,9.78 20.955,11.03 21.101,11.176 22.301,11.176 22.888,11.763 22.918,11.763 23.063,11.908 C17.1 23.056,11.945 23.056,13.074 R6.1 23.05,15.049 23.976,15.975 25.446,15.975 S2.1
PA0: U4.10
PA1: U4.11
PA2: U4.12
PA3: U4.13
PA4: C22.2 R13.2 U4.14 | length 2.9
  Top Layer w0.25: R13.2 C22.2 16.293,8.855 16.799,8.855 17.054,8.6 U4.14
PA5: U4.15
PA6: R14.1 U4.16 | length 14
  Top Layer w0.25: R14.1 8.603,4.763 11.764,7.924 14.986,7.924 15.055,7.855 16.656,7.855 16.911,7.6 U4.16
PA7: U4.17
PA8: U4.29
PA9: U4.30
PA10: U4.31
PA11: U4.32
PA12: U4.33
"PA13 / SWDIO": J3.2 U4.34 | length 13.1
  Top Layer w0.25: U4.34 22.959,1.797 23.105,1.651 28.829,1.651 29.464,1.016 30.555,1.016 31.369,1.83 31.369,2.467 32.385,3.483 32.385,4.272 32.388,4.275 J3.2@32.385,4.277
"PA14 / SWCLK": J3.3 U4.37 | length 8.1
  Top Layer w0.3: U4.37 25.571,3.6
  Top Layer w0.5: 25.571,3.6 26.162,4.191 26.162,5.803 26.455,6.096 28.067,6.096 J3.3
PA15: U4.38
PB0: U4.18
PB1: U4.19
PB2: U4.20
PB3: U4.39
PB4: U4.40
PB5: U4.41
PB6: U4.42
PB7: U4.43
PB8: U4.45
PB9: U4.46
PB10: U4.21
PB12: U4.25
PB13: U4.26
PB14: U4.27
PB15: U4.28
PC13: D2.2 U4.2 | length 4.3
  Top Layer w0.25: U4.2 23.459,10.505 23.68,10.726 24.834,10.726 25.654,9.906 26.384,9.906 D2.2
PC14: U4.3 Y2.3 | length 4.5
  Top Layer w0.25: U4.3@22.955,10.035 22.965,10.045 22.965,11.027 23.114,11.176 25.782,11.176 25.798,11.192 25.928,11.192 26.203,11.467 Y2.3
PC15: U4.4
PH0: U4.5
PH1: U4.6
VBAT: U4.1
VCC: C5.2 C6.2 C7.1 J1.1A J1.1B U1.3 U2.3 | length 25
  Top Layer w0.25: J1.1A 7.95,32.025 10.577,29.398 10.577,22.443 11.303,21.717 11.303,18.051 11.155,17.903 ; U2.3 11.155,17.903 ; U1.3 16.317,17.846 15.987,17.516 15.987,16.157 15.841,16.011 14.25,16.011 13.035,17.226 11.832,17.226 11.155,17.903
Vout: R13.1 U5.1 | length 5.7
  Top Layer w0.25: U5.1 12.268,8.763 13.665,10.16 R13.1
VREF+: C15.2 C16.2 L3.1 U4.9 | length 4.8
  Top Layer w0.25: L3.1 18.696,12.383 19.748,12.383 C16.2 ; C15.2 C16.2 ; U4.9@19.955,9.78 19.955,11.168 19.812,11.311 C16.2
pads on no net: J1. J3. S2.2 S2.4 U1.5 U2.1 U2.2 U2.7 U3.4 U5.3

## Polygon pours and split planes (outlines as drawn)
+12 on Top Layer "+12_L01_P006" (solid, pour order 6): -6.096,8.255 0.012,8.255 2.171,10.414 3.671,10.414 3.671,8.296 1.725,6.35 -6.096,6.35
+12 on Top Layer "+12_L01_P005" (solid, pour order 5): 0.254,14.859 0.254,12.319 2.171,10.402 2.171,8.294 3.669,8.294 3.725,8.35 3.683,8.392 3.683,10.541 5.842,12.7 5.715,12.827 5.715,14.859
+3.3 on Top Layer "+3.3_L01_P000" (solid, pour order 0): 25.172,34.227 27.712,34.227 27.712,28.702 24.511,28.702 24.511,22.352 20.219,22.352 20.219,14.034 18.949,14.034 18.949,23.368 22.378,23.368 22.378,30.924 25.172,30.924
GND on Bottom Layer "GND_L02_P003" (solid, remove dead copper, pour order 3): -12.319,41.402 41.275,41.402 42.672,40.005 42.672,-6.35 -12.827,-6.35 -19.304,0.127 -11.938,7.493 -11.938,41.529

## Keep-outs
Keep-Out Layer:
  lines w0.5: -9.648,-1.016 ccw(c-9.398,-1.016) -9.398,-1.266 ; -9.648,-1.016 ccw(c-9.398,-1.016) -9.398,-1.266 ; -9.648,-1.016 -9.648,10.541 ; -9.648,10.541 cw(c-9.398,10.541) -9.398,10.791 ; -9.648,10.541 cw(c-9.398,10.541) -9.398,10.791 ; -9.398,-1.266 38.989,-1.266 ; -9.398,10.791 -1.755,10.791 -1.647,10.899 -1.647,20.578 -4.318,20.578 ; -4.568,20.828 ccw(c-4.318,20.828) -4.318,20.578 ; -4.568,20.828 ccw(c-4.318,20.828) -4.318,20.578 ; -4.568,20.828 -4.568,31.623 ; -4.568,31.623 cw(c-4.318,31.623) -4.318,31.873 ; -4.568,31.623 cw(c-4.318,31.623) -4.318,31.873 ; -4.318,31.873 -1.647,31.873 -1.647,38.735 ; -1.651,10.291 ccw(c-1.651,10.541) -1.474,10.364 ; -1.651,10.291 ccw(c-1.651,10.541) -1.474,10.364 ; -1.651,10.291 -9.148,10.291 -9.148,-0.766 38.739,-0.766 38.739,8.333 35.133,11.815 ; -1.647,38.735 cw(c-1.397,38.735) -1.397,38.985 ; -1.647,38.735 cw(c-1.397,38.735) -1.397,38.985 ; -1.474,10.364 ccw(c-1.651,10.541) -1.474,10.364 ; -1.474,10.364 -1.22,10.618 ; -1.474,10.364 -1.474,10.364 ; -1.474,10.364 -1.474,10.364 ; -1.397,21.078 cw(c-1.397,20.828) -1.147,20.828 ; -1.397,21.078 cw(c-1.397,20.828) -1.147,20.828 ; -1.397,21.078 -4.068,21.078 -4.068,31.373 -1.397,31.373 ; -1.397,31.373 ccw(c-1.397,31.623) -1.147,31.623 ; -1.397,31.373 ccw(c-1.397,31.623) -1.147,31.623 ; -1.397,38.985 12.192,38.985 ; -1.22,10.618 ccw(c-1.397,10.795) -1.147,10.795 ; -1.22,10.618 ccw(c-1.397,10.795) -1.147,10.795 ; -1.22,10.618 ccw(c-1.397,10.795) -1.22,10.618 ; -1.22,10.618 -1.22,10.618 ; -1.22,10.618 -1.22,10.618 ; -1.147,10.795 -1.147,20.828 ; -1.147,31.623 -1.147,38.485 12.088,38.485 15.317,35.256 ; 12.192,38.985 cw(c12.192,38.735) 12.369,38.912 ; 12.192,38.985 cw(c12.192,38.735) 12.369,38.912 ; 12.369,38.912 ccw(c12.192,38.735) 12.369,38.912 ; 12.369,38.912 12.369,38.912 ; 12.369,38.912 12.369,38.912 ; 12.369,38.912 15.598,35.683 29.845,35.683 ; 15.317,35.256 ccw(c15.494,35.433) 15.494,35.183 ; 15.317,35.256 ccw(c15.494,35.433) 15.317,35.256 ; 15.317,35.256 ccw(c15.494,35.433) 15.494,35.183 ; 15.317,35.256 15.317,35.256 ; 15.317,35.256 15.317,35.256 ; 15.494,35.183 29.741,35.183 32.516,32.408 32.516,22.987 ; 29.845,35.683 cw(c29.845,35.433) 30.022,35.61 ; 29.845,35.683 cw(c29.845,35.433) 30.022,35.61 ; 30.022,35.61 ccw(c29.845,35.433) 30.022,35.61 ; 30.022,35.61 30.022,35.61 ; 30.022,35.61 30.022,35.61 ; 30.022,35.61 32.943,32.689 ; 32.516,22.987 ccw(c32.766,22.987) 32.766,22.737 ; 32.516,22.987 ccw(c32.766,22.987) 32.766,22.737 ; 32.766,22.737 33.678,22.737 35.056,21.359 35.056,11.995 ; 32.943,32.689 ccw(c32.766,32.512) 32.943,32.689 ; 32.943,32.689 cw(c32.766,32.512) 33.016,32.512 ; 32.943,32.689 cw(c32.766,32.512) 33.016,32.512 ; 32.943,32.689 32.943,32.689 ; 32.943,32.689 32.943,32.689 ; 33.016,32.512 33.016,23.237 33.782,23.237 ; 33.782,23.237 cw(c33.782,22.987) 33.959,23.164 ; 33.782,23.237 cw(c33.782,22.987) 33.959,23.164 ; 33.959,23.164 ccw(c33.782,22.987) 33.959,23.164 ; 33.959,23.164 33.959,23.164 ; 33.959,23.164 33.959,23.164 ; 33.959,23.164 35.483,21.64 ; 35.056,11.995 ccw(c35.306,11.995) 35.132,11.815 35.133,11.815 ; 35.056,11.995 ccw(c35.306,11.995) 35.133,11.815 ; 35.483,21.64 ccw(c35.306,21.463) 35.483,21.64 ; 35.483,21.64 cw(c35.306,21.463) 35.556,21.463 ; 35.483,21.64 cw(c35.306,21.463) 35.556,21.463 ; 35.483,21.64 35.483,21.64 ; 35.483,21.64 35.483,21.64 ; 35.556,21.463 35.556,12.101 39.162,8.619 ; 38.989,-1.266 ccw(c38.989,-1.016) 39.239,-1.016 ; 38.989,-1.266 ccw(c38.989,-1.016) 39.239,-1.016 ; 39.162,8.619 cw(c38.989,8.439) 39.239,8.439 ; 39.162,8.619 39.163,8.619 cw(c38.989,8.439) 39.239,8.439 ; 39.239,-1.016 39.239,8.439

## Other copper
Top Layer:
  rectangle net GND: 20.371,11.938 21.006,18.288
  rectangle net GND: 0.254,19.304 9.144,21.717
  rectangle net VCC: 0.25,27.813 11.049,33.2
  rectangle net VCC: 8.763,22.479 11.049,28.321
  rectangle net +5: 15.367,32.258 24.638,34.036
  rectangle net +5: 15.367,25.527 17.145,34.036
  rectangle net +5: 11.938,26.67 17.018,29.972
  rectangle net +12: 3.976,12.7 8.509,13.8
  region net VCC: 0.25,33.2 2.975,33.2 3.575,33.8 3.575,36.525 3.65,36.6 4.6,36.6 4.6,35.275 4.825,35.05 7,35.05 7.3,35.35 7.3,35.75 8.2,35.75 8.2,34.75 7.3,34.75 6.675,34.125 6.675,33.75 7.225,33.2 9.125,33.2 9.125,30.85 9.15,30.825 0.25,30.825 0.25,33.2 0.275,33.225